# Altium PCB 24V-70A-Power-Board-v2.0.PcbDoc (part 2 of 9)
Units mm, origin at the board's own origin, x right, y up, seen from the top; angles counter-clockwise.
Board outline 350 x 215 mm, 2 copper layers (Top Layer, Bottom Layer), stack 1.64 mm thick; 337 components, 182 nets, 856 pads, 561 vias.
Unrouted connection lines stored in the file: 58.
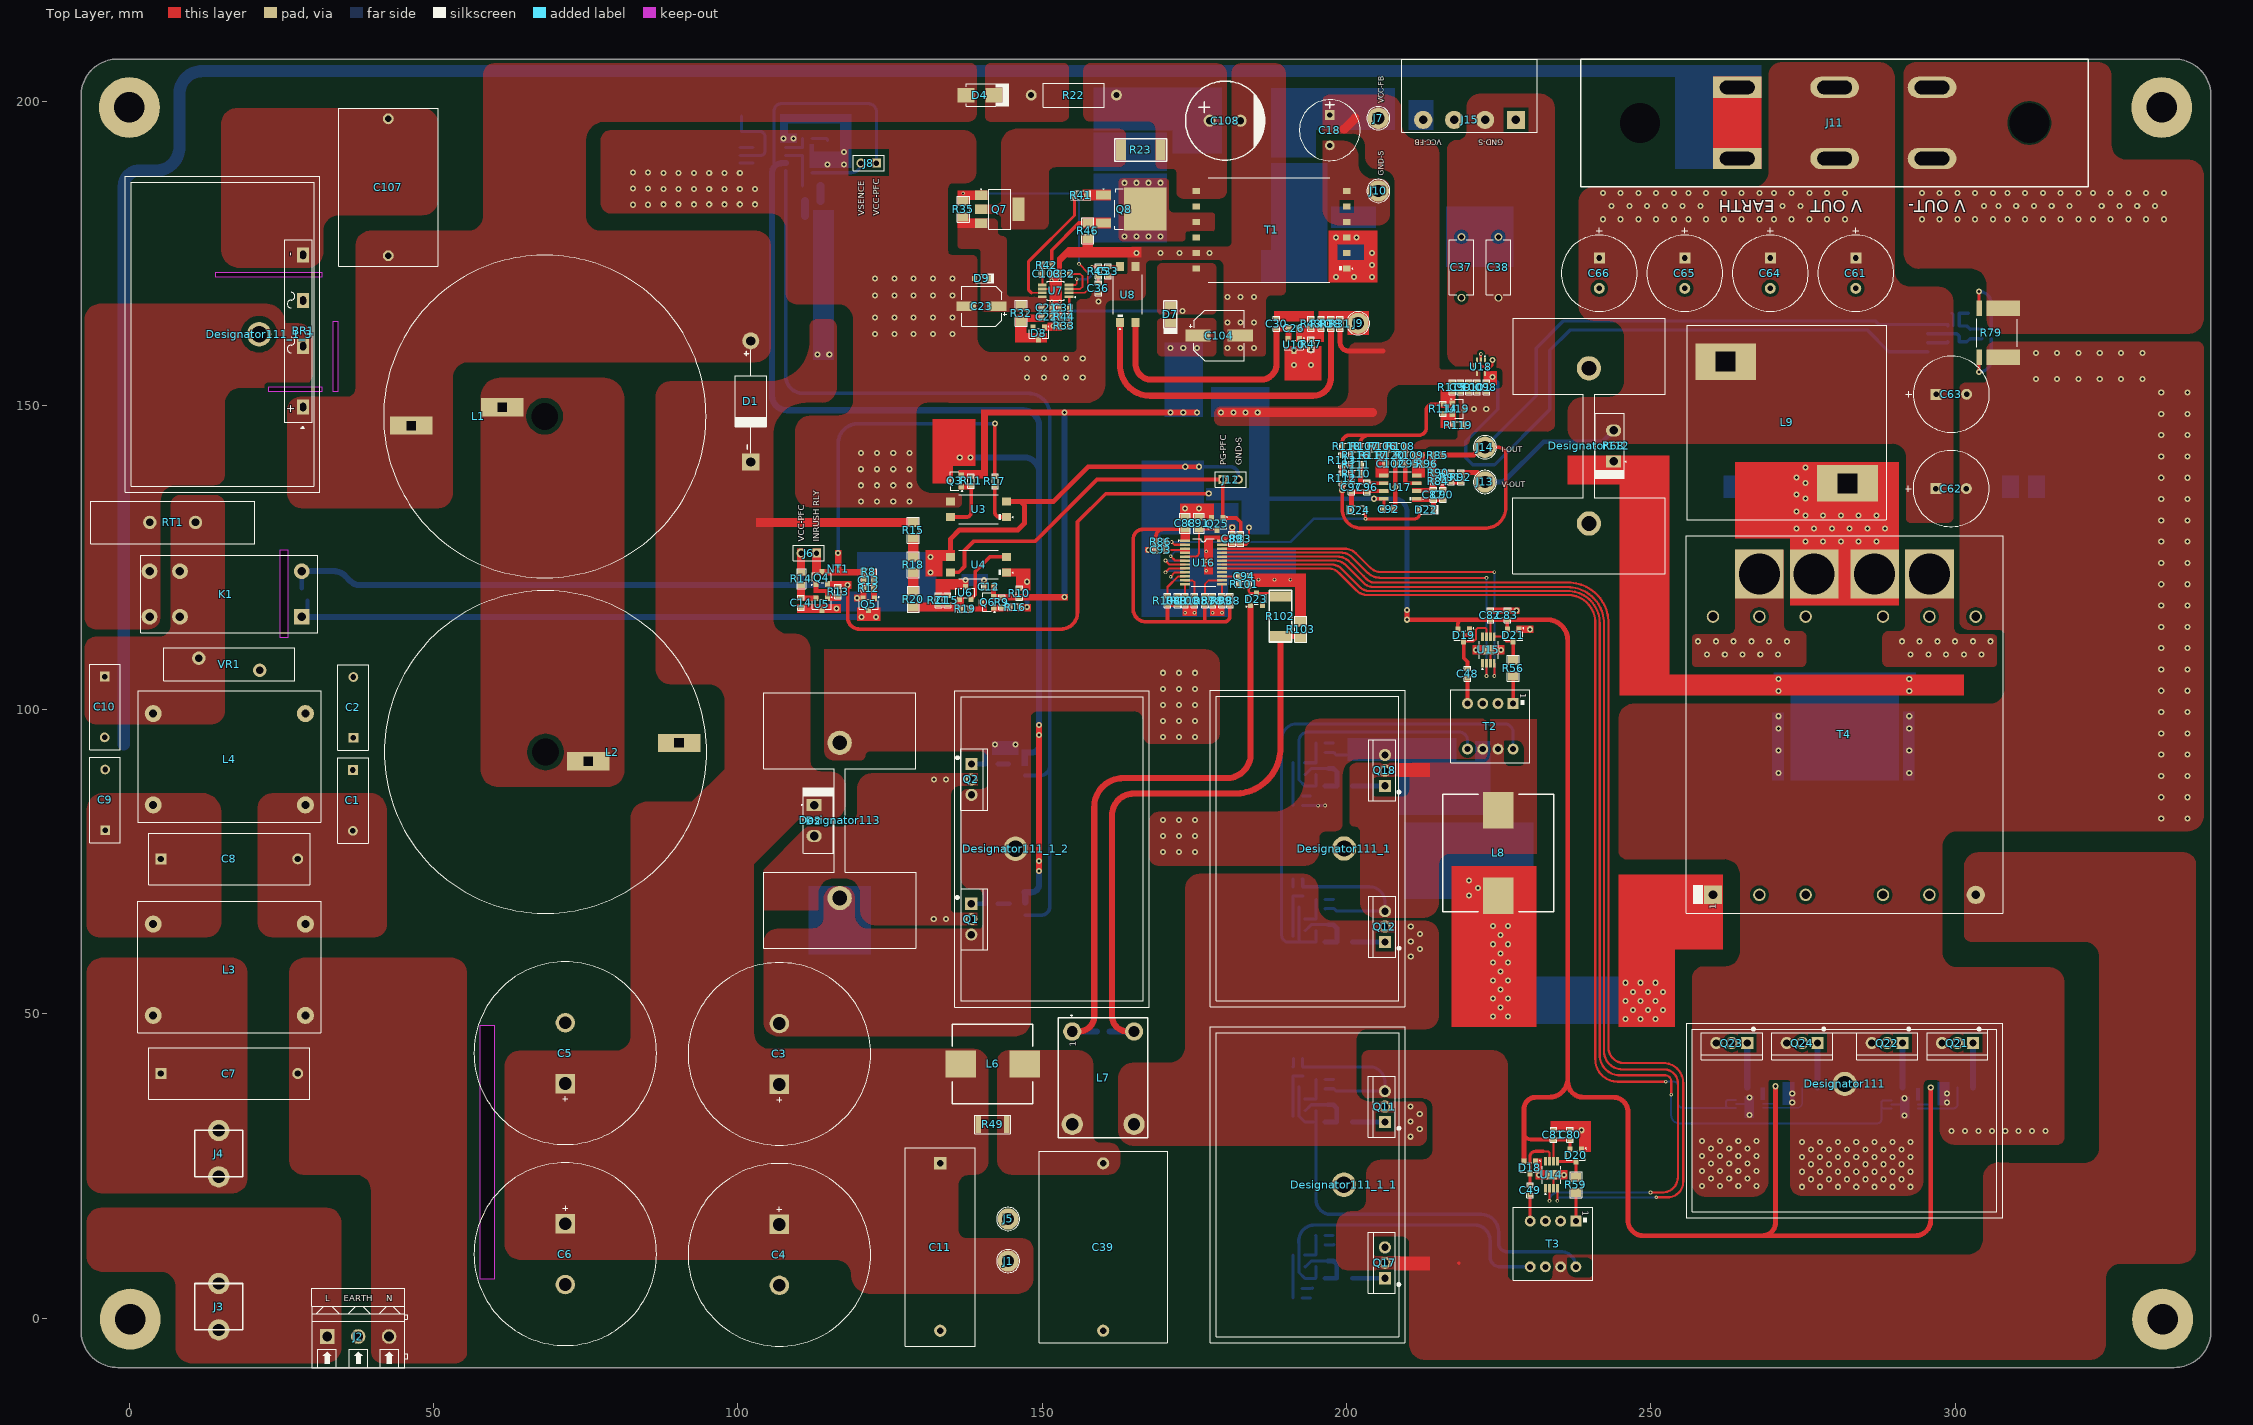
[diagram p0: Top Layer view]

## Part data (continued)
C19 C20: library part C3225X7R1E106MTJ00N, "CAP CER 10UF 25V X7R 1210", LCSC Part Number=C694198, Manufacturer="TDK Corporation", Manufacturer Part Number=C3225X7R1E106M250AC, Package=1210, ComponentLink1Description=LCSC, ComponentLink1URL=https://www.lcsc.com/product-detail/Multilayer-Ceramic-Capacitors-MLCC-SMD-SMT_TDK-C3225X7R1E106MTJ00N_C694198.html, Item Type=Capacitors
C23: library part EEE-FK1H220P, "CAP ALUM 22UF 20% 50V SMD", Case/Package=Radial, Dielectric Material=158ConductorMaterial, ESR (Equivalent Series Resistance)=880mR, LCSC Part Number=C128458, Leakage Current=3uA, Manufacturer=Panasonic, Max Operating Temperature=105°C, Min Operating Temperature=-55°C, Package Quantity=1000, Ratings=AEC-Q200, Ripple Current=165mA, Tolerance=20%, Voltage=50V, ComponentLink1Description=https://datasheet.ciiva.com/11777/0900766b80e4e8b0-11777316.pdf?src-supplier=Rs, ComponentLink1URL=https://datasheet.ciiva.com/11777/0900766b80e4e8b0-11777316.pdf?src-supplier=Rs, ComponentLink2Description=https://datasheet.ciiva.com/43463/58258-43463528.pdf?src-supplier=Farnell, ComponentLink2URL=https://datasheet.ciiva.com/43463/58258-43463528.pdf?src-supplier=Farnell, ComponentLink3Description=https://datasheet.ciiva.com/46388/58258-46388569.pdf?src-supplier=Element14, ComponentLink3URL=https://datasheet.ciiva.com/46388/58258-46388569.pdf?src-supplier=Element14, ComponentLink4Description=https://datasheet.ciiva.com/28691/1676921-28691087.pdf?src-supplier=Element14, ComponentLink4URL=https://datasheet.ciiva.com/28691/1676921-28691087.pdf?src-supplier=Element14, ComponentLink5Description=https://datasheet.ciiva.com/24072/aba0000ce120-24072156.pdf?src-supplier=Mouser, ComponentLink5URL=https://datasheet.ciiva.com/24072/aba0000ce120-24072156.pdf?src-supplier=Mouser, ComponentLink6Description=https://datasheet.ciiva.com/14605/70258115-14605607.pdf?src-supplier=Allied+Electronics, ComponentLink6URL=https://datasheet.ciiva.com/14605/70258115-14605607.pdf?src-supplier=Allied+Electronics, ComponentLink7Description=https://datasheet.ciiva.com/14607/70258115-14607833.pdf?src-supplier=Allied+Electronics, ComponentLink7URL=https://datasheet.ciiva.com/14607/70258115-14607833.pdf?src-supplier=Allied+Electronics, ComponentLink8Description=https://datasheet.ciiva.com/43485/1676921-43485511.pdf?src-supplier=Farnell, ComponentLink8URL=https://datasheet.ciiva.com/43485/1676921-43485511.pdf?src-supplier=Farnell, ComponentLink9Description=https://datasheet.ciiva.com/46388/1676921-46388589.pdf?src-supplier=Element14, ComponentLink9URL=https://datasheet.ciiva.com/46388/1676921-46388589.pdf?src-supplier=Element14, ComponentLink10Description=https://datasheet.ciiva.com/6085/1676921-6085161.pdf?src-supplier=Farnell, ComponentLink10URL=https://datasheet.ciiva.com/6085/1676921-6085161.pdf?src-supplier=Farnell, ComponentLink11Description=https://datasheet.ciiva.com/46376/1676921-46376472.pdf?src-supplier=Element14, ComponentLink11URL=https://datasheet.ciiva.com/46376/1676921-46376472.pdf?src-supplier=Element14, ComponentLink12Description=https://datasheet.ciiva.com/16449/aba0000ce120-16449096.pdf?src-supplier=Future+Electronics, ComponentLink12URL=https://datasheet.ciiva.com/16449/aba0000ce120-16449096.pdf?src-supplier=Future+Electronics, Construction=Cylindrical, Diameter=6.3mm, Dissipation Factor=10%, Height=5.8mm, Impedance=880mR, Item Type=Capacitors, Lead Free="Lead Free", Length=5.8mm, Life (Hours)=2000Hour, Manufacturer Part Number=EEE-FK1H220P, Mounting Technology="Surface Mount,PCB", Packaging="Tape and Reel", Pins=2, Pricing="1=0.42, 10=0.227, 50=0.227, 100=0.147, 1000=0.117, 10000=0.098 (USD)", Radiation Hardening=No, Reach SVHC Compliant=No, Ripple Current (AC)=165mA, RoHS=Yes, RoHS Compliant=Yes, Series=FK, Stock=69938, Supplier=Mouser, Termination=SMD/SMT, Voltage Rating=50V, Voltage Rating (DC)=50V, Width=7.8mm
C25 C26 C96: library part 06035A561JAT2A, "CAP CER 560PF 50V C0G/NP0 0603", LCSC Part Number=C597173, Manufacturer="Kyocera AVX", ComponentLink1Description=https://datasheet.ciiva.com/27051/1032160-27051276.pdf?src-supplier=Jameco, ComponentLink1URL=https://datasheet.ciiva.com/27051/1032160-27051276.pdf?src-supplier=Jameco, ComponentLink2Description=https://datasheet.ciiva.com/16286/ccog-16286446.pdf?src-supplier=Future+Electronics, ComponentLink2URL=https://datasheet.ciiva.com/16286/ccog-16286446.pdf?src-supplier=Future+Electronics, ComponentLink3Description=https://datasheet.ciiva.com/150/ccog-150647.pdf?src-supplier=Digikey, ComponentLink3URL=https://datasheet.ciiva.com/150/ccog-150647.pdf?src-supplier=Digikey, ComponentLink4Description=https://datasheet.ciiva.com/150/ccog-150648.pdf?src-supplier=Digikey, ComponentLink4URL=https://datasheet.ciiva.com/150/ccog-150648.pdf?src-supplier=Digikey, ComponentLink5Description=https://datasheet.ciiva.com/150/ccog-150649.pdf?src-supplier=Digikey, ComponentLink5URL=https://datasheet.ciiva.com/150/ccog-150649.pdf?src-supplier=Digikey, ComponentLink6Description=https://datasheet.ciiva.com/2987/ccog-2987809.pdf?src-supplier=Avnet, ComponentLink6URL=https://datasheet.ciiva.com/2987/ccog-2987809.pdf?src-supplier=Avnet, ComponentLink7Description=https://datasheet.ciiva.com/2987/ccog-2987810.pdf?src-supplier=Avnet, ComponentLink7URL=https://datasheet.ciiva.com/2987/ccog-2987810.pdf?src-supplier=Avnet, ComponentLink8Description=https://datasheet.ciiva.com/5423/ccog-5423589.pdf?src-supplier=Mouser, ComponentLink8URL=https://datasheet.ciiva.com/5423/ccog-5423589.pdf?src-supplier=Mouser, ComponentLink9Description=https://datasheet.ciiva.com/14598/70001039-14598549.pdf?src-supplier=Allied+Electronics, ComponentLink9URL=https://datasheet.ciiva.com/14598/70001039-14598549.pdf?src-supplier=Allied+Electronics, ComponentLink10Description=https://datasheet.ciiva.com/1124/425357-1124836.pdf?src-supplier=Element14, ComponentLink10URL=https://datasheet.ciiva.com/1124/425357-1124836.pdf?src-supplier=Element14, ComponentLink11Description=https://datasheet.ciiva.com/1124/425357-1124837.pdf?src-supplier=Element14, ComponentLink11URL=https://datasheet.ciiva.com/1124/425357-1124837.pdf?src-supplier=Element14, Item Type=Capacitor, Manufacturer Part Number=06035A561JAT2A, Pricing="4000=0.0172, 16000=0.0165, 40000=0.0091, 60000=0.0158, 100000=0.0088, 120000=0.0155, 160000=0.0083, 300000=0.0148 (USD)", RoHS=Yes, Stock=180000, Supplier="Future Electronics"
C27: library part CC0603JRNPO9BN821, "CAP CER 820PF 50V C0G/NPO 0603", Case Code (Imperial)=0603, Case Code (Metric)=1608, Dielectric=C0G, LCSC Part Number=C107057, Manufacturer=Yageo, Max Operating Temperature=125°C, Min Operating Temperature=-55°C, Tolerance=5%, Voltage Rating=50V, Case/Package=0603, ComponentLink1Description=https://datasheet.ciiva.com/26829/getdatasheetpartid-403541-26829388.pdf?src-supplier=Verical, ComponentLink1URL=https://datasheet.ciiva.com/26829/getdatasheetpartid-403541-26829388.pdf?src-supplier=Verical, Depth=0.8mm, Height=0.8mm, Item Type=Capacitors, Lead Free="Lead Free", Length=1.6mm, Manufacturer Part Number=CC0603JRNPO9BN821, Mounting Technology="Surface Mount", Packaging="Tape and Reel", Pins=2, Pricing="4000=0.0129, 24000=0.0087, 48000=0.0086 (USD)", Radiation Hardening=No, RoHS=Yes, RoHS Compliant=Yes, Series=CC, Stock=772000, Supplier="Arrow Electronics", Termination=SMD/SMT, Thickness=0.035inch, Voltage Rating (DC)=50V, Width=0.031inch
C28: library part CL10A474KB8NNNC, "CAP CER 0.47UF 50V X5R 0603", Capacitance=470nF, Case Code (Imperial)=0603, Case Code (Metric)=1608, Dielectric=X5R, LCSC Part Number=C170149, Manufacturer=Samsung, Max Operating Temperature=85°C, Min Operating Temperature=-55°C, Package Quantity=1, Tolerance=10%, Voltage Rating=50V, Case/Package=0603, Category="Ceramic Capacitors", ComponentLink1Description=https://datasheet.ciiva.com/25798/cl10a474kb8nnnc-25798516.pdf?src-supplier=Digi-Key, ComponentLink1URL=https://datasheet.ciiva.com/25798/cl10a474kb8nnnc-25798516.pdf?src-supplier=Digi-Key, ComponentLink2Description=https://datasheet.ciiva.com/15195/getdatasheetpartid-353290-15195713.pdf?src-supplier=Verical, ComponentLink2URL=https://datasheet.ciiva.com/15195/getdatasheetpartid-353290-15195713.pdf?src-supplier=Verical, Construction=Flat, Depth=0.8mm, Height=0.8mm, Lead Free="Lead Free", Length=1.6mm, Manufacturer Part Number=CL10A474KB8NNNC, Mount="Surface Mount", Packaging="Tape and Reel", Pricing 1="200000=0.04290, 300000=0.04250, 400000=0.04210, 500000=0.04170, 1000000=0.04120, 2000000=0.04080 (USD)", Radiation Hardening=No, RoHS=Yes, RoHS Compliant=Yes, Series=CL, Stock 1=196000, Supplier 1="Arrow Electronics", Supplier Part Number 1=CL10A474KB8NNNC, Thickness=0.035inch, Voltage Rating (DC)=50V, Width=0.031inch
C29: library part C1210C335K5RAC7800, "CAP CER 3.3UF 50V X7R 1210", Manufacturer=KEMET, Package=1210, Item Type=Capacitor, Manufacturer Part Number=C1210C335K5RAC7800
C31: library part CGA3E2C0G2A680JT0Y0N, "CAP CER 68PF 100V C0G 0603", LCSC Part Number=C694224, Manufacturer=TDK, Package=0603, Item Type=Capacitor, Manufacturer Part Number=CGA3E2C0G2A680JT0Y0N
C32 C95 C102: library part CC0603KRX7R7BB224, "CAP CER 0.22UF 16V X7R 0603", Manufacturer=Yageo, Supplier Part Number=311-1426-1-ND, Voltage Rating (DC)=16V, ComponentLink1Description=https://datasheet.ciiva.com/11788/0900766b80d84f1d-11788400.pdf?src-supplier=Rs, ComponentLink1URL=https://datasheet.ciiva.com/11788/0900766b80d84f1d-11788400.pdf?src-supplier=Rs, ComponentLink2Description=https://datasheet.ciiva.com/176/mlccorderingcode-176606.pdf?src-supplier=Digikey, ComponentLink2URL=https://datasheet.ciiva.com/176/mlccorderingcode-176606.pdf?src-supplier=Digikey, ComponentLink3Description=https://datasheet.ciiva.com/176/mlccorderingcode-176607.pdf?src-supplier=Digikey, ComponentLink3URL=https://datasheet.ciiva.com/176/mlccorderingcode-176607.pdf?src-supplier=Digikey, ComponentLink4Description=https://datasheet.ciiva.com/176/mlccorderingcode-176608.pdf?src-supplier=Digikey, ComponentLink4URL=https://datasheet.ciiva.com/176/mlccorderingcode-176608.pdf?src-supplier=Digikey, Halogen Free=5694HalogenFree, Item Type=Capacitor, Lead Free=5697LeadFree, Manufacturer Part Number=CC0603KRX7R7BB224, Material=4241ConductorMaterial, Pricing="1=0.1, 10=0.058, 50=0.0334, 100=0.0258, 500=0.01944, 1000=0.01528 (USD)", RoHS=Yes, Stock=45192, Supplier=Digikey
C33 C93 C103: library part C1608C0G1H221JT000N, "CAP CER 220PF 50V C0G 0603", LCSC Part Number=C695131, Manufacturer="TDK Corporation", Manufacturer Part Number=C1608C0G1H221J080AA, Package=0603, ComponentLink1Description=LCSC, ComponentLink1URL=https://www.lcsc.com/product-detail/Multilayer-Ceramic-Capacitors-MLCC-SMD-SMT_TDK-C1608C0G1H221JT000N_C695131.html, Item Type=Capacitors
C36 C42 C43 C44 C45 C52 C53 C54 C55 C79 C86 C97: library part CGA3E2X7R2A223K080AA, "CAP CER 0.022UF 100V X7R 0603", Case Code (Imperial)=0603, Case Code (Metric)=1608, Dielectric=X7R, LCSC Part Number=C2167165, Manufacturer=TDK, Max Operating Temperature=125°C, Min Operating Temperature=-55°C, Package Quantity=1, Ratings=AEC-Q200, Resistor Type=Ceramic, Supplier Part Number 1=445-5814-1-ND, Tolerance=10%, Voltage Rating=100V, Capacitance=22nF, Case/Package=0603, Category="Ceramic Capacitors", ComponentLink1Description=https://datasheet.ciiva.com/22725/1735406-22725648.pdf?src-supplier=Element14, ComponentLink1URL=https://datasheet.ciiva.com/22725/1735406-22725648.pdf?src-supplier=Element14, ComponentLink2Description=https://datasheet.ciiva.com/24218/cga3e2x7r2a223k080aa-266292-24218959.pdf?src-supplier=Mouser, ComponentLink2URL=https://datasheet.ciiva.com/24218/cga3e2x7r2a223k080aa-266292-24218959.pdf?src-supplier=Mouser, ComponentLink3Description=https://datasheet.ciiva.com/7975/1807242-7975349.pdf?src-supplier=Element14, ComponentLink3URL=https://datasheet.ciiva.com/7975/1807242-7975349.pdf?src-supplier=Element14, Depth=0.8mm, Height=0.8mm, Item Type=Capacitor, Length=1.6mm, Manufacturer Part Number=CGA3E2X7R2A223K080AA, Mount="Surface Mount", Packaging="Tape and Reel", Pricing 1="1=0.11000, 10=0.07600, 50=0.04340, 100=0.03590, 500=0.02516, 1000=0.02083 (USD)", REACH SVHC="No SVHC", RoHS=Yes, RoHS Compliant=Yes, Series=CGA, Stock 1=56079, Supplier 1=Digi-Key, Termination=SMD/SMT, Thickness=0.035inch, Voltage Rating (DC)=100V, Weight=7.1E-05oz, Width=0.031inch
C37 C38: library part DE1E3RA222MN4AP01F, "CAP CER 2200PF 1.5KV RADIAL", LCSC Part Number=C1622500, Manufacturer=Murata, ComponentLink1Description=https://search.murata.co.jp/Ceramy/image/img/A01X/G101/ENG/DE1_RA_P01F_E.pdf?src-supplier=Digikey, ComponentLink1URL=https://search.murata.co.jp/Ceramy/image/img/A01X/G101/ENG/DE1_RA_P01F_E.pdf?src-supplier=Digikey, ComponentLink2Description=http://search.murata.co.jp/Ceramy/image/img/A01X/G101/ENG/DE1_RA_P01F_E.pdf?src-supplier=Digikey, ComponentLink2URL=http://search.murata.co.jp/Ceramy/image/img/A01X/G101/ENG/DE1_RA_P01F_E.pdf?src-supplier=Digikey, Item Type=Capacitors, Manufacturer Part Number=DE1E3RA222MN4AP01F, Pricing="600=0.0835, 2400=0.0795, 9000=0.0758, 18000=0.074, 45000=0.0699 (USD)", RoHS=Yes, Stock=1200, Supplier="Future Electronics"
C39: library part B32774X5106K000, "FILM CAP MKP DC FILTERING - 600V", Manufacturer=TDK, Supplier Part Number=495-B32774X5106K000-ND, Item Type=Capacitor, Manufacturer Part Number=B32774X5106K000, Pricing="1=4.3, 10=2.896, 50=2.3266, 224=1.97978, 672=1.80198, 1120=1.77575 (USD)", RoHS=No, Supplier=Digikey
C58 C59 C60: library part GRM32ER71H106KA12L, "CAP CER 10UF 50V X7R 1210", LCSC Part Number=C77102, Manufacturer=Murata, ComponentLink1Description=https://datasheet.ciiva.com/16497/product-16497010.pdf?src-supplier=Future+Electronics, ComponentLink1URL=https://datasheet.ciiva.com/16497/product-16497010.pdf?src-supplier=Future+Electronics, ComponentLink2Description=https://datasheet.ciiva.com/3777/4286grm32er71h106ka1223-3777306.pdf?src-supplier=Arrow+Electronics, ComponentLink2URL=https://datasheet.ciiva.com/3777/4286grm32er71h106ka1223-3777306.pdf?src-supplier=Arrow+Electronics, ComponentLink3Description=https://datasheet.ciiva.com/11789/0900766b80ef921d-11789081.pdf?src-supplier=Rs, ComponentLink3URL=https://datasheet.ciiva.com/11789/0900766b80ef921d-11789081.pdf?src-supplier=Rs, ComponentLink4Description=https://datasheet.ciiva.com/11607/c02e-11607596.pdf?src-supplier=Avnet, ComponentLink4URL=https://datasheet.ciiva.com/11607/c02e-11607596.pdf?src-supplier=Avnet, ComponentLink5Description=https://datasheet.ciiva.com/6270/partnumbering-e-01-6270167.pdf?src-supplier=Digikey, ComponentLink5URL=https://datasheet.ciiva.com/6270/partnumbering-e-01-6270167.pdf?src-supplier=Digikey, ComponentLink6Description=https://datasheet.ciiva.com/6270/partnumbering-e-01-6270168.pdf?src-supplier=Digikey, ComponentLink6URL=https://datasheet.ciiva.com/6270/partnumbering-e-01-6270168.pdf?src-supplier=Digikey, ComponentLink7Description=https://datasheet.ciiva.com/6270/partnumbering-e-01-6270169.pdf?src-supplier=Digikey, ComponentLink7URL=https://datasheet.ciiva.com/6270/partnumbering-e-01-6270169.pdf?src-supplier=Digikey, ComponentLink8Description=https://datasheet.ciiva.com/46441/1754714-46441340.pdf?src-supplier=Element14, ComponentLink8URL=https://datasheet.ciiva.com/46441/1754714-46441340.pdf?src-supplier=Element14, Item Type=Capacitors, Lead Free=5697LeadFree, Manufacturer Part Number=GRM32ER71H106KA12L, Pricing="1000=0.325, 2000=0.32, 3000=0.315, 4000=0.315, 5000=0.305 (USD)", RoHS=Yes, RoHS Compliant=5897YesNo, Stock=960000, Supplier="Future Electronics"
C61 C62 C63 C64 C65 C66: library part EKZM500ELL471MK20S, "CAP ALUM 50V POLAR", Case/Package=Aluminum, Manufacturer="United Chemi-Con", Max Operating Temperature=105°C, Min Operating Temperature=-40°C, Supplier Part Number=565-EKZM500ELL471MK20S-ND, Tolerance=20%, Voltage Rating=50V, Category="Aluminum Electrolytic Capacitors", ComponentLink1Description=http://www.mouser.com/ds/2/420/15133587752d6c58fb020c-1090524.pdf?src-supplier=Mouser, ComponentLink1URL=http://www.mouser.com/ds/2/420/15133587752d6c58fb020c-1090524.pdf?src-supplier=Mouser, Dissipation Factor=0.1%, Length=20mm, Manufacturer Part Number=EKZM500ELL471MK20S, Packaging=Bulk, Pricing="1=1.02, 10=0.631, 50=0.4744, 100=0.4255, 500=0.34218, 1000=0.31616, 3000=0.28378, 5000=0.27172 (USD)", RoHS=Yes, RoHS Compliant=Yes, Series=KZM, Stock=1959, Supplier=Digikey, Termination=Radial
C71 C72 C77 C78: library part CC1206KKX7RBBB471, "CAP CER 470PF 500V X7R 1206", LCSC Part Number=C513662, Manufacturer=Yageo, ComponentLink1Description=https://datasheet.ciiva.com/26918/getdatasheetpartid-411464-26918346.pdf?src-supplier=Verical, ComponentLink1URL=https://datasheet.ciiva.com/26918/getdatasheetpartid-411464-26918346.pdf?src-supplier=Verical, ComponentLink2Description=https://datasheet.ciiva.com/16743/upy-np0x7r-mv-100-to-630v-9-16743389.pdf?src-supplier=Future+Electronics, ComponentLink2URL=https://datasheet.ciiva.com/16743/upy-np0x7r-mv-100-to-630v-9-16743389.pdf?src-supplier=Future+Electronics, ComponentLink3Description=https://datasheet.ciiva.com/29534/mlccorderingcode-29534108.pdf?src-supplier=Digikey, ComponentLink3URL=https://datasheet.ciiva.com/29534/mlccorderingcode-29534108.pdf?src-supplier=Digikey, ComponentLink4Description=https://datasheet.ciiva.com/13209/upy-gp-np0-16v-to-50v-8-13209817.pdf?src-supplier=Mouser, ComponentLink4URL=https://datasheet.ciiva.com/13209/upy-gp-np0-16v-to-50v-8-13209817.pdf?src-supplier=Mouser, ComponentLink5Description=https://datasheet.ciiva.com/11466/upy-np0x7r-mv-100-to-630v-9-11466693.pdf?src-supplier=Avnet, ComponentLink5URL=https://datasheet.ciiva.com/11466/upy-np0x7r-mv-100-to-630v-9-11466693.pdf?src-supplier=Avnet, Item Type=Capacitors, Lead Free=5697LeadFree, Manufacturer Part Number=CC1206KKX7RBBB471, Pricing="3000=0.0149, 12000=0.0145, 30000=0.0142, 75000=0.014, 120000=0.0136 (USD)", RoHS=Yes, Stock=75000, Supplier="Future Electronics"
C73 C74 C75 C76: library part C3216X7R2E104KT0L0U, "250V 100nF X7R ±10% 1206 Multilayer Ceramic Capacitors MLCC - SMD/SMT ROHS", LCSC Part Number=C76671, Manufacturer=TDK, Package=1206, ComponentLink1Description=LCSC, ComponentLink1URL=https://www.lcsc.com/product-detail/Multilayer-Ceramic-Capacitors-MLCC-SMD-SMT_TDK-C3216X7R2E104KT0L0U_C76671.html, Item Type=Capacitor, Manufacturer Part Number=C3216X7R2E104KT0L0U
C84: library part CL10C102JB8NNNC, "CAP CER 1000PF 50V C0G/NP0 0603", Capacitance=1nF, Case Code (Imperial)=0603, Case Code (Metric)=1608, Dielectric=C0G, LCSC Part Number=C163508, Manufacturer=Samsung, Max Operating Temperature=125°C, Min Operating Temperature=-55°C, Package Quantity=1, Supplier Part Number 1=7665279, Temperature Coefficient=300ppm/°C, Tolerance=5%, Voltage=50V, Case/Package=0603, Category="Ceramic Capacitors", ComponentLink1Description=https://datasheet.ciiva.com/15195/getdatasheetpartid-354056-15195790.pdf?src-supplier=Verical, ComponentLink1URL=https://datasheet.ciiva.com/15195/getdatasheetpartid-354056-15195790.pdf?src-supplier=Verical, ComponentLink2Description=https://datasheet.ciiva.com/29198/458273-da-01-en-vs-kondensator-0603-29198494.pdf?src-supplier=Conrad, ComponentLink2URL=https://datasheet.ciiva.com/29198/458273-da-01-en-vs-kondensator-0603-29198494.pdf?src-supplier=Conrad, ComponentLink3Description=https://datasheet.ciiva.com/26310/mlcc-catalogdownload2013-eng-26310329.pdf?src-supplier=Distrelec, ComponentLink3URL=https://datasheet.ciiva.com/26310/mlcc-catalogdownload2013-eng-26310329.pdf?src-supplier=Distrelec, Depth=0.8mm, Height=0.8mm, Item Type=Capacitor, Lead Free="Lead Free", Length=1.6mm, Manufacturer Part Number=CL10C102JB8NNNC, Material=Ceramic, Mount="Surface Mount", Packaging="Tape and Reel", Pricing 1="4000=0.00600, 12000=0.00600, 20000=0.00600, 40000=0.00500, 100000=0.00500 (GBP)", Radiation Hardening=No, RoHS=Yes, RoHS Compliant=Yes, Series=CL, Stock 1=616000, Supplier 1=RSComponents, Thickness=0.035inch, Voltage Rating=50V, Voltage Rating (DC)=50V, Width=0.031inch
C87: library part C1608C0G1H222JT000N, "CAP CER 2200PF 50V C0G 0603", LCSC Part Number=C76601, Manufacturer="TDK Corporation", Manufacturer Part Number=C1608C0G1H222J080AA, Package=0603, ComponentLink1Description=LCSC, ComponentLink1URL=https://www.lcsc.com/product-detail/Multilayer-Ceramic-Capacitors-MLCC-SMD-SMT_TDK-C1608C0G1H222JT000N_C76601.html, Item Type=Capacitor
C88: library part EMK212B7225KGHT, "CAP CER 2.2UF 16V X7R 0805", LCSC Part Number=C385899, Manufacturer="Taiyo Yuden", ComponentLink1Description=http://www.mouser.com/ds/2/396/mlcc11_hq_e-541564.pdf?src-supplier=Mouser, ComponentLink1URL=http://www.mouser.com/ds/2/396/mlcc11_hq_e-541564.pdf?src-supplier=Mouser, ComponentLink2Description=https://datasheet.octopart.com/EMK212B7225KGHT-Taiyo-Yuden-datasheet-152732874.pdf?src-supplier=Newark, ComponentLink2URL=https://datasheet.octopart.com/EMK212B7225KGHT-Taiyo-Yuden-datasheet-152732874.pdf?src-supplier=Newark, ComponentLink3Description=https://datasheet.octopart.com/EMK212B7225KGHT-Taiyo-Yuden-datasheet-97186030.pdf?src-supplier=Future+Electronics, ComponentLink3URL=https://datasheet.octopart.com/EMK212B7225KGHT-Taiyo-Yuden-datasheet-97186030.pdf?src-supplier=Future+Electronics, ComponentLink4Description="https://ds.yuden.co.jp/TYCOMPAS/ut/detail?pn=EMK212B7225KGHT  &amp;u=M&src-supplier=Digikey", ComponentLink4URL="https://ds.yuden.co.jp/TYCOMPAS/ut/detail?pn=EMK212B7225KGHT  &amp;u=M&src-supplier=Digikey", ComponentLink5Description=http://www.yuden.co.jp/productdata/catalog/en/mlcc01_hq_e.pdf?src-supplier=Digikey, ComponentLink5URL=http://www.yuden.co.jp/productdata/catalog/en/mlcc01_hq_e.pdf?src-supplier=Digikey, ComponentLink6Description=http://www.yuden.co.jp/ut/product/category/capacitor/putpdf/EMK212B7225KGHT.pdf?src-supplier=Avnet, ComponentLink6URL=http://www.yuden.co.jp/ut/product/category/capacitor/putpdf/EMK212B7225KGHT.pdf?src-supplier=Avnet, ComponentLink7Description=https://datasheet.octopart.com/EMK212B7225KGHT-Taiyo-Yuden-datasheet-154808297.pdf?src-supplier=Master+Electronics, ComponentLink7URL=https://datasheet.octopart.com/EMK212B7225KGHT-Taiyo-Yuden-datasheet-154808297.pdf?src-supplier=Master+Electronics, Halogen Free=5694HalogenFree, Item Type=Capacitors, Lead Free=5697LeadFree, Manufacturer Part Number=EMK212B7225KGHT, Material=4241ConductorMaterial, Pricing="1=0.24, 10=0.137, 50=0.097, 100=0.0847, 500=0.06374, 1000=0.05721 (USD)", RoHS=Yes, Stock=8236, Supplier=Digikey
C91: library part VJ0805Y474KXJTW1BC, "CAP CER 0.47UF 16V X7R 0805", LCSC Part Number=C2174635, Manufacturer="Vishay Vitramon", ComponentLink1Description=https://datasheet.ciiva.com/5416/vjw1bcbascomseries-223529-5416469.pdf?src-supplier=Mouser, ComponentLink1URL=https://datasheet.ciiva.com/5416/vjw1bcbascomseries-223529-5416469.pdf?src-supplier=Mouser, Item Type=Capacitors, Manufacturer Part Number=VJ0805Y474KXJTW1BC, Pricing="1=0.2, 10=0.092, 50=0.092, 100=0.053, 1000=0.048, 10000=0.037 (USD)", RoHS=Yes, Stock=5925, Supplier=Mouser
C94 C101: library part CC0603JRNPO9BN331, "CAP CER 330PF 50V C0G/NPO 0603", Capacitor Type=Ceramic, Case/Package=0603, LCSC Part Number=C62784, Manufacturer=Yageo, Max Operating Temperature=125°C, Min Operating Temperature=-55°C, Package Shape=Rectangular, Package Style=SMTMeter, Rated DC Voltage (URdc)=50V, Supplier Part Number 1=8843708, Temperature Characteristics Code=C0G, Tolerance  (fill in as +-)=5%, Category="Ceramic Capacitors", ComponentLink1Description=https://datasheet.ciiva.com:443/pdfs/VipMasterIC/IC/YAGO/YAGO-S-A0009251638/YAGO-S-A0009251638-1.pdf?src-supplier=IHS+Markit, ComponentLink1URL=https://datasheet.ciiva.com:443/pdfs/VipMasterIC/IC/YAGO/YAGO-S-A0009251638/YAGO-S-A0009251638-1.pdf?src-supplier=IHS+Markit, ComponentLink2Description=https://datasheet.ciiva.com/28450/1443161-28450501.pdf?src-supplier=Element14, ComponentLink2URL=https://datasheet.ciiva.com/28450/1443161-28450501.pdf?src-supplier=Element14, ComponentLink3Description=https://datasheet.ciiva.com/144/mlccorderingcode-144957.pdf?src-supplier=Digi-Key, ComponentLink3URL=https://datasheet.ciiva.com/144/mlccorderingcode-144957.pdf?src-supplier=Digi-Key, ComponentLink4Description=https://datasheet.ciiva.com/144/mlccorderingcode-144956.pdf?src-supplier=Digi-Key, ComponentLink4URL=https://datasheet.ciiva.com/144/mlccorderingcode-144956.pdf?src-supplier=Digi-Key, ComponentLink5Description=https://datasheet.ciiva.com/144/mlccorderingcode-144958.pdf?src-supplier=Digi-Key, ComponentLink5URL=https://datasheet.ciiva.com/144/mlccorderingcode-144958.pdf?src-supplier=Digi-Key, ComponentLink6Description=https://datasheet.ciiva.com/8033/1443161-8033739.pdf?src-supplier=Element14, ComponentLink6URL=https://datasheet.ciiva.com/8033/1443161-8033739.pdf?src-supplier=Element14, ComponentLink7Description=https://datasheet.ciiva.com/8033/1443161-8033737.pdf?src-supplier=Element14, ComponentLink7URL=https://datasheet.ciiva.com/8033/1443161-8033737.pdf?src-supplier=Element14, ComponentLink8Description=https://datasheet.ciiva.com/13389/upy-gp-np0-16v-to-50v-8-13389983.pdf?src-supplier=Mouser, ComponentLink8URL=https://datasheet.ciiva.com/13389/upy-gp-np0-16v-to-50v-8-13389983.pdf?src-supplier=Mouser, ComponentLink9Description=https://datasheet.ciiva.com/11587/upy-gp-np0-16v-to-50v-8-11587326.pdf?src-supplier=Avnet, ComponentLink9URL=https://datasheet.ciiva.com/11587/upy-gp-np0-16v-to-50v-8-11587326.pdf?src-supplier=Avnet, ComponentLink10Description=https://datasheet.ciiva.com/26829/getdatasheetpartid-403533-26829382.pdf?src-supplier=Verical, ComponentLink10URL=https://datasheet.ciiva.com/26829/getdatasheetpartid-403533-26829382.pdf?src-supplier=Verical, Dielectric Material=Ceramic, Height=0.8mm, Item Type=Capacitor, JESD-609 Code=e3, Length=1.6mm, Manufacturer Part Number=CC0603JRNPO9BN331, Mounting Technology="Surface Mount", Multilayer=Yes, Packaging="Tape and Reel", Pins=2, Pricing 1="4000=0.00990, 16000=0.00940, 20000=0.00980, 40000=0.00910, 80000=0.00930, 100000=0.00880, 160000=0.00830, 200000=0.00900, 500000=0.00850 (USD)", Reach SVHC Compliant=Yes, RoHS=Yes, RoHS Compliant=Yes, Stock 1=40000, Supplier 1="Future Electronics", Terminal Finish=Nickel, Termination=Wraparound, Tolerance (fill in as +-)=5%, Width=0.8mm
C104: library part 25SVPF100M, "CAP ALUM POLY 100UF 20% 25V SMD", Case/Package=Radial, ESR (Equivalent Series Resistance)=24mR, LCSC Part Number=C136279, Leakage Current=500uA, Manufacturer=Panasonic, Max Operating Temperature=105°C, Min Operating Temperature=-55°C, Package Quantity=1000, Ripple Current=3.2A, Supplier Part Number 1=P123675CT-ND, Tolerance=20%, Voltage=25V, Capacitance=100uF, Category="Aluminum Electrolytic Capacitors", ComponentLink1Description=https://datasheet.ciiva.com/25746/1734360-25746518.pdf?src-supplier=Farnell, ComponentLink1URL=https://datasheet.ciiva.com/25746/1734360-25746518.pdf?src-supplier=Farnell, ComponentLink2Description=https://datasheet.ciiva.com/22746/1734360-22746213.pdf?src-supplier=Element14, ComponentLink2URL=https://datasheet.ciiva.com/22746/1734360-22746213.pdf?src-supplier=Element14, ComponentLink3Description=https://datasheet.ciiva.com/24064/svpf-os-262415-24064540.pdf?src-supplier=Mouser, ComponentLink3URL=https://datasheet.ciiva.com/24064/svpf-os-262415-24064540.pdf?src-supplier=Mouser, Diameter=8mm, Dissipation Factor=12%, Height=6.9mm, Height - Seated (Max)=0.276inch, Item Type=Capacitor, Lead Free="Lead Free", Length=6.9mm, Life (Hours)=5000Hour, Manufacturer Part Number=25SVPF100M, Mount="Surface Mount", Number of Pins=7, Packaging="Tape and Reel", Pricing 1="1=1.68000, 10=1.32800, 50=1.15080, 100=0.99590, 500=0.75246 (USD)", Reach SVHC Compliant=Yes, Ripple Current (AC)=3.2A, RoHS=Yes, RoHS Compliant=Yes, Series="OS-CON, SVPF", Stock 1=5809, Supplier 1=Digi-Key, Termination=SMD/SMT, Voltage Rating=25V, Voltage Rating (DC)=25V
C107: library part ECW-FA2J225J, "CAP FILM 2.2UF 5% 630VDC RADIAL", Case/Package=Radial, Dielectric=PP, Manufacturer=Panasonic, Max Operating Temperature=105°C, Min Operating Temperature=-40°C, Package Quantity=400, Supplier Part Number=667-ECW-FA2J225J, Tolerance=5%, Voltage Rating=630V, ComponentLink1Description=https://datasheet.ciiva.com/15908/abd0000ce47-15908716.pdf?src-supplier=Onlinecomponents.com, ComponentLink1URL=https://datasheet.ciiva.com/15908/abd0000ce47-15908716.pdf?src-supplier=Onlinecomponents.com, ComponentLink2Description=https://datasheet.ciiva.com/30167/44abd0000ce47-30167191.pdf?src-supplier=Onlinecomponents.com, ComponentLink2URL=https://datasheet.ciiva.com/30167/44abd0000ce47-30167191.pdf?src-supplier=Onlinecomponents.com, ComponentLink3Description=https://datasheet.ciiva.com/6282/abd0000ce47-6282218.pdf?src-supplier=Digikey, ComponentLink3URL=https://datasheet.ciiva.com/6282/abd0000ce47-6282218.pdf?src-supplier=Digikey, Dielectric Material=PP, Height=21.4mm, Item Type=Capacitors, Lead Pitch=22.5mm, Length=26mm, Manufacturer Part Number=ECW-FA2J225J, Mounting Technology="Through Hole", Packaging=Bulk, Pricing="1=1.91, 10=1.33, 50=1.07, 100=0.965, 1000=0.75, 10000=0.75 (USD)", Reach SVHC Compliant=Unknown, RoHS=Yes, Series=ECW-F(A), Stock=55, Supplier=Mouser, Termination="PC Pins", Voltage Rating (DC)=630V, Width=16.3mm
C108: library part 01EC2051, "22uF 450V 1.9Ω@100kHz ±20% 560mA@100kHz Plugin,D13xL20mm Aluminum Electrolytic Capacitors - Leaded ROHS", LCSC Part Number=C2766207, Manufacturer=KNSCHA, Package=Plugin,D13xL20mm, ComponentLink1Description=LCSC, ComponentLink1URL=https://www.lcsc.com/product-detail/Aluminum-Electrolytic-Capacitors-Leaded_KNSCHA-01EC2051_C2766207.html, Item Type=Capacitor, Manufacturer Part Number=01EC2051
D1: "DIODE GEN PURP 600V 3A DO201AD", Average Rectified Current=3A, Case/Package=DO-201AD, LCSC Part Number=C467496, Manufacturer="Vishay Semiconductors", Max Operating Temperature=150°C, Max Repetitive Reverse Voltage (Vrrm)=600V, Max Reverse Current=5uA, Max Surge Current=200A, Min Operating Temperature=-50°C, Package Quantity=1000, ComponentLink1Description=http://www.mouser.com/ds/2/427/1n5400-240276.pdf?src-supplier=Mouser, ComponentLink1URL=http://www.mouser.com/ds/2/427/1n5400-240276.pdf?src-supplier=Mouser, ComponentLink2Description=http://www.vishay.com/docs/88516/1n5400.pdf?src-supplier=Digikey, ComponentLink2URL=http://www.vishay.com/docs/88516/1n5400.pdf?src-supplier=Digikey, ComponentLink3Description=http://www.vishay.com/docs/88516/1n5400.pdf?src-supplier=Avnet, ComponentLink3URL=http://www.vishay.com/docs/88516/1n5400.pdf?src-supplier=Avnet, Contact Plating=Tin,Matte, Forward Current=3A, Item Type=Diode, Manufacturer Part Number=1N5406-E3/73, Max Reverse Voltage (DC)=600V, Mounting Technology="Through Hole", Packaging="Tape and Reel", Peak Non-Repetitive Surge Current=200A, Pricing="1=0.53, 10=0.453, 50=0.453, 100=0.315, 1000=0.214, 10000=0.16 (USD)", Radiation Hardening=No, Reverse Voltage=600V, RoHS=Yes, Series=-, Stock=23612, Supplier=Mouser
D2: "600V 1.8V@10A 10A TO-220-2 SiC Diodes ROHS", LCSC Part Number=C535874, Manufacturer=Infineon, ComponentLink1Description=https://datasheet.ciiva.com/924/infineon-idh10sg60c-ds-v02-04-en-924234.pdf?src-supplier=Digikey, ComponentLink1URL=https://datasheet.ciiva.com/924/infineon-idh10sg60c-ds-v02-04-en-924234.pdf?src-supplier=Digikey, ComponentLink2Description=https://datasheet.ciiva.com/16386/idh10sg60c-rev2-4-78863-16386579.pdf?src-supplier=Mouser, ComponentLink2URL=https://datasheet.ciiva.com/16386/idh10sg60c-rev2-4-78863-16386579.pdf?src-supplier=Mouser, ComponentLink3Description=https://datasheet.ciiva.com/8300/infineon-idh10sg60c-ds-v02-04-en-8300971.pdf?src-supplier=Avnet, ComponentLink3URL=https://datasheet.ciiva.com/8300/infineon-idh10sg60c-ds-v02-04-en-8300971.pdf?src-supplier=Avnet, Item Type=Diodes, Manufacturer Part Number=IDH10SG60C, Pricing="1=5.14, 10=4.32, 50=4.32, 100=3.49, 1000=2.66, 10000=2.5 (USD)", RoHS=Yes, Stock=239, Supplier=Mouser
D3 D8 D10 D23: "200V Independent Type 1.25V@200mA 50ns 200mA SOT-23 Switching Diodes ROHS", LCSC Part Number=C3313195, Manufacturer=MCC, Package=SOT-23, ComponentLink1Description=LCSC, ComponentLink1URL=https://www.lcsc.com/product-detail/Switching-Diodes_MCC-Micro-Commercial-Components-BAS21HE3-TP_C3313195.html, Item Type=Diode, Manufacturer Part Number=BAS21HE3-TP
D4: "DIODE GEN PURP 1KV 1A SMB", Average Rectified Current=1A, Case/Package=SMB, Forward Voltage=1.3V, LCSC Part Number=C154864, Manufacturer=Diodes, Max Operating Temperature=150°C, Max Repetitive Reverse Voltage (Vrrm)=1kV, Max Reverse Current=5uA, Max Surge Current=30A, Min Operating Temperature=-65°C, Package Quantity=3000, ComponentLink1Description=https://datasheet.ciiva.com/8301/ds15002-8301721.pdf?src-supplier=Avnet, ComponentLink1URL=https://datasheet.ciiva.com/8301/ds15002-8301721.pdf?src-supplier=Avnet, ComponentLink2Description=https://datasheet.ciiva.com/26818/getdatasheetpartid-91887-26818092.pdf?src-supplier=Verical, ComponentLink2URL=https://datasheet.ciiva.com/26818/getdatasheetpartid-91887-26818092.pdf?src-supplier=Verical, ComponentLink3Description=https://datasheet.ciiva.com/8301/ds15002-8301350.pdf?src-supplier=Avnet, ComponentLink3URL=https://datasheet.ciiva.com/8301/ds15002-8301350.pdf?src-supplier=Avnet, Current Rating=1A, Forward Current=1A, Height=2.42mm, Item Type=Diodes, Lead Free="Lead Free", Length=4.57mm, Manufacturer Part Number=RS1MB-13-F, Max Reverse Voltage (DC)=1kV, Mounting Technology="Surface Mount", Output Current=1A, Packaging="Tape and Reel", Peak Non-Repetitive Surge Current=30A, Pins=2, Polarity=Standard, Pricing="3000=0.0825, 6000=0.093, 9000=0.0794, 12000=0.0905, 15000=0.078, 30000=0.0761, 60000=0.0732 (USD)", Radiation Hardening=No, Recovery Time=500ns, Reverse Recovery Time=500ns, Reverse Recovery Time-Max=500ns, Reverse Voltage (DC)=1kV, RoHS=Yes, RoHS Compliant=Yes, Series=-, Stock=45000, Supplier="Future Electronics", Voltage Rating (DC)=1kV, Weight=0.00328oz, Width=3.94mm
D5: "DIODE SCHOTTKY 100V 2A SMB", LCSC Part Number=C83299, Manufacturer="ON Semiconductor", ComponentLink1Description=https://datasheet.ciiva.com/916/mbrs2h100-d-916033.pdf?src-supplier=Digikey, ComponentLink1URL=https://datasheet.ciiva.com/916/mbrs2h100-d-916033.pdf?src-supplier=Digikey, ComponentLink2Description=https://datasheet.ciiva.com/13084/mbrs2h100-d-76602-13084146.pdf?src-supplier=Mouser, ComponentLink2URL=https://datasheet.ciiva.com/13084/mbrs2h100-d-76602-13084146.pdf?src-supplier=Mouser, ComponentLink3Description=https://datasheet.ciiva.com/30479/0900766b812769c5-30479153.pdf?src-supplier=Rs, ComponentLink3URL=https://datasheet.ciiva.com/30479/0900766b812769c5-30479153.pdf?src-supplier=Rs, ComponentLink4Description=https://datasheet.ciiva.com/8292/mbrs2h100-d-8292460.pdf?src-supplier=Avnet, ComponentLink4URL=https://datasheet.ciiva.com/8292/mbrs2h100-d-8292460.pdf?src-supplier=Avnet, ComponentLink5Description=https://datasheet.ciiva.com/8294/mbrs2h100-d-8294965.pdf?src-supplier=Avnet, ComponentLink5URL=https://datasheet.ciiva.com/8294/mbrs2h100-d-8294965.pdf?src-supplier=Avnet, ComponentLink6Description=https://datasheet.ciiva.com/916/mbrs2h100-d-916034.pdf?src-supplier=Digikey, ComponentLink6URL=https://datasheet.ciiva.com/916/mbrs2h100-d-916034.pdf?src-supplier=Digikey, ComponentLink7Description=https://datasheet.ciiva.com/916/mbrs2h100-d-916035.pdf?src-supplier=Digikey, ComponentLink7URL=https://datasheet.ciiva.com/916/mbrs2h100-d-916035.pdf?src-supplier=Digikey, Halogen Free=5694HalogenFree, Item Type=Diode, Lead Free=5697LeadFree, Manufacturer Part Number=MBRS2H100T3G, Pricing="2500=0.155, 5000=0.151, 7500=0.15, 10000=0.148, 12500=0.144 (USD)", RoHS=Yes, Stock=27500, Supplier="Future Electronics"
D6: "DIODE GEN PURP 600V 1A SMA", Average Rectified Current=2A, Case/Package=SMA, Forward Voltage=1.25V, LCSC Part Number=C50432, Manufacturer="ON Semiconductor", Max Forward Surge Current (Ifsm)=30A, Max Operating Temperature=175°C, Max Repetitive Reverse Voltage (Vrrm)=600V, Max Reverse Current=5uA, Min Operating Temperature=-65°C, Output Current=1A, Package Quantity=1, ComponentLink1Description=https://datasheet.ciiva.com/8293/mura160t3-d-8293035.pdf?src-supplier=Avnet, ComponentLink1URL=https://datasheet.ciiva.com/8293/mura160t3-d-8293035.pdf?src-supplier=Avnet, ComponentLink2Description=https://datasheet.ciiva.com/27056/2015775-27056224.pdf?src-supplier=Jameco, ComponentLink2URL=https://datasheet.ciiva.com/27056/2015775-27056224.pdf?src-supplier=Jameco, ComponentLink3Description=https://datasheet.ciiva.com/16395/mura160t3-d-16395990.pdf?src-supplier=Future+Electronics, ComponentLink3URL=https://datasheet.ciiva.com/16395/mura160t3-d-16395990.pdf?src-supplier=Future+Electronics, Current Rating=2A, Forward Current=2A, Halogen Free="Halogen Free", Height=2mm, Item Type=Diode, Lead Free="Lead Free", Length=4.32mm, Manufacturer Part Number=MURA160T3G, Max Reverse Voltage (DC)=600V, Max Surge Current=30A, Packaging="Tape and Reel", Peak Non-Repetitive Surge Current=30A, Pins=2, Polarity=Standard, Pricing="5000=0.109, 10000=0.106, 15000=0.104, 20000=0.103, 25000=0.0996 (USD)", Radiation Hardening=No, Reach SVHC Compliant=No, Recovery Time=75ns, Reverse Recovery Time=75ns, Reverse Recovery Time-Max=75ns, Reverse Voltage=600V, RoHS=Yes, RoHS Compliant=Yes, Series=-, Stock=190000, Supplier="Future Electronics", Voltage Rating (DC)=600V, Width=2.6mm
D7: "Diode Zener Single 13V 5% 200mW 2-Pin SOD-323 T/R", LCSC Part Number=C669053, Manufacturer=MCC, Supplier Part Number=MMSZ5243BS-FDICT-ND, Category="Zener Diodes", ComponentLink1Description=https://datasheet.ciiva.com/26844/getdatasheetpartid-746365-26844934.pdf?src-supplier=Verical, ComponentLink1URL=https://datasheet.ciiva.com/26844/getdatasheetpartid-746365-26844934.pdf?src-supplier=Verical, ComponentLink2Description=https://datasheet.ciiva.com/913/smd15pl-smd1200plsod-123fl-913095.pdf?src-supplier=Digikey, ComponentLink2URL=https://datasheet.ciiva.com/913/smd15pl-smd1200plsod-123fl-913095.pdf?src-supplier=Digikey, ComponentLink3Description=https://datasheet.ciiva.com/913/smd15pl-smd1200plsod-123fl-913096.pdf?src-supplier=Digikey, ComponentLink3URL=https://datasheet.ciiva.com/913/smd15pl-smd1200plsod-123fl-913096.pdf?src-supplier=Digikey, ComponentLink4Description=https://datasheet.ciiva.com/913/smd15pl-smd1200plsod-123fl-913097.pdf?src-supplier=Digikey, ComponentLink4URL=https://datasheet.ciiva.com/913/smd15pl-smd1200plsod-123fl-913097.pdf?src-supplier=Digikey, ComponentLink5Description=https://datasheet.ciiva.com/8348/ds31038-8348008.pdf?src-supplier=Avnet, ComponentLink5URL=https://datasheet.ciiva.com/8348/ds31038-8348008.pdf?src-supplier=Avnet, ComponentLink6Description=https://datasheet.ciiva.com/891/ds31038-891527.pdf?src-supplier=Digikey, ComponentLink6URL=https://datasheet.ciiva.com/891/ds31038-891527.pdf?src-supplier=Digikey, ComponentLink7Description=https://datasheet.ciiva.com/891/ds31038-891528.pdf?src-supplier=Digikey, ComponentLink7URL=https://datasheet.ciiva.com/891/ds31038-891528.pdf?src-supplier=Digikey, ComponentLink8Description=https://datasheet.ciiva.com/891/ds31038-891529.pdf?src-supplier=Digikey, ComponentLink8URL=https://datasheet.ciiva.com/891/ds31038-891529.pdf?src-supplier=Digikey, Item Type=Diodes, Lead Free=5697LeadFree, Manufacturer Part Number=SMD110PL-TP, Pricing="1=0.15, 10=0.105, 100=0.0702, 500=0.05344, 1000=0.04776 (USD)", RoHS=Yes, Stock=3669579, Supplier=Digikey
D9: "DIODE ZENER 13V 200MW SOD323", LCSC Part Number=C5249130, Manufacturer="Diodes Zetex", ComponentLink1Description=https://datasheet.ciiva.com/8348/ds31038-8348008.pdf?src-supplier=Avnet, ComponentLink1URL=https://datasheet.ciiva.com/8348/ds31038-8348008.pdf?src-supplier=Avnet, ComponentLink2Description=https://datasheet.ciiva.com/891/ds31038-891527.pdf?src-supplier=Digikey, ComponentLink2URL=https://datasheet.ciiva.com/891/ds31038-891527.pdf?src-supplier=Digikey, ComponentLink3Description=https://datasheet.ciiva.com/891/ds31038-891528.pdf?src-supplier=Digikey, ComponentLink3URL=https://datasheet.ciiva.com/891/ds31038-891528.pdf?src-supplier=Digikey, ComponentLink4Description=https://datasheet.ciiva.com/891/ds31038-891529.pdf?src-supplier=Digikey, ComponentLink4URL=https://datasheet.ciiva.com/891/ds31038-891529.pdf?src-supplier=Digikey, Item Type=Diodes, Manufacturer Part Number=MMSZ5243BS-7-F, Pricing="1=0.15, 10=0.105, 100=0.0707, 500=0.05384, 1000=0.04814 (USD)", RoHS=Yes, Stock=7247, Supplier=Digikey
D11 D12 D14 D15 D18 D19 D20 D21: "DIODE ARR SCHOTT 30V 200MA SOT23", Average Rectified Current=200mA, Case/Package=SOT-23-3, Forward Voltage=800mV, LCSC Part Number=C19726, Manufacturer="ON Semiconductor", Max Forward Surge Current (Ifsm)=600mA, Max Operating Temperature=150°C, Max Repetitive Reverse Voltage (Vrrm)=30V, Max Reverse Current=2uA, Min Operating Temperature=-55°C, Package Quantity=1, Peak Non-Repetitive Surge Current=1A, Power Dissipation=225mW, ComponentLink1Description=https://datasheet.ciiva.com/1180/bat54slt1-d-1180304.pdf?src-supplier=Element14, ComponentLink1URL=https://datasheet.ciiva.com/1180/bat54slt1-d-1180304.pdf?src-supplier=Element14, ComponentLink2Description=https://datasheet.ciiva.com/1180/bat54slt1-d-1180305.pdf?src-supplier=Element14, ComponentLink2URL=https://datasheet.ciiva.com/1180/bat54slt1-d-1180305.pdf?src-supplier=Element14, ComponentLink3Description=https://datasheet.ciiva.com/14558/70099484-14558437.pdf?src-supplier=Allied+Electronics, ComponentLink3URL=https://datasheet.ciiva.com/14558/70099484-14558437.pdf?src-supplier=Allied+Electronics, Current Rating=200mA, Element Configuration=Dual, Forward Current=200mA, Halogen Free="Halogen Free", Height=0.94mm, Item Type=Diode, Lead Free="Lead Free", Length=2.9mm, Manufacturer Part Number=BAT54SLT1G, Max Reverse Leakage Current=2uA, Max Reverse Voltage (DC)=30V, Max Surge Current=600mA, Packaging="Tape and Reel", Pins=3, Pricing="3000=0.0141, 12000=0.0135, 30000=0.0131, 75000=0.0128, 120000=0.0122 (USD)", Radiation Hardening=No, Reach SVHC Compliant=No, Recovery Time=5ns, Reverse Recovery Time=5ns, Reverse Voltage=30V, RoHS=No, Series=-, Stock=10110000, Supplier="Future Electronics", Voltage Rating (DC)=30V, Width=1.3mm
D13 D16: "SMC(DO-214AB) Diodes - Fast Recovery Rectifiers ROHS", LCSC Part Number=C7436549, Manufacturer=FUXINSEMI, Package=SMC(DO-214AB), ComponentLink1Description=LCSC, ComponentLink1URL=https://www.lcsc.com/product-detail/Diodes-Fast-Recovery-Rectifiers_FUXINSEMI-MURS360T3G_C7436549.html, Item Type=Diodes, Manufacturer Part Number=MURS360T3G
D17: "DIODE ARRAY GP 200V 8A D2PAK", LCSC Part Number=C236158, Manufacturer="ON Semiconductor", ComponentLink1Description=https://datasheet.ciiva.com/906/murb1620ct-d-906005.pdf?src-supplier=Digikey, ComponentLink1URL=https://datasheet.ciiva.com/906/murb1620ct-d-906005.pdf?src-supplier=Digikey, ComponentLink2Description=https://datasheet.ciiva.com/16293/murb1620ct-d-16293538.pdf?src-supplier=Future+Electronics, ComponentLink2URL=https://datasheet.ciiva.com/16293/murb1620ct-d-16293538.pdf?src-supplier=Future+Electronics, ComponentLink3Description=https://datasheet.ciiva.com/8292/murb1620ct-d-8292357.pdf?src-supplier=Avnet, ComponentLink3URL=https://datasheet.ciiva.com/8292/murb1620ct-d-8292357.pdf?src-supplier=Avnet, ComponentLink4Description=https://datasheet.ciiva.com/906/murb1620ct-d-906006.pdf?src-supplier=Digikey, ComponentLink4URL=https://datasheet.ciiva.com/906/murb1620ct-d-906006.pdf?src-supplier=Digikey, ComponentLink5Description=https://datasheet.ciiva.com/906/murb1620ct-d-906007.pdf?src-supplier=Digikey, ComponentLink5URL=https://datasheet.ciiva.com/906/murb1620ct-d-906007.pdf?src-supplier=Digikey, Item Type=Diode, Manufacturer Part Number=MURB1620CTT4G, Pricing="800=0.64, 1600=0.625, 2400=0.615, 3200=0.61, 4000=0.59 (USD)", RoHS=Yes, Stock=72800, Supplier="Future Electronics"
D22 D24: "DIODE SCHOTTKY 30V 200MA SOD323", LCSC Part Number=C134397, Manufacturer=Diodes, ComponentLink1Description=https://datasheet.ciiva.com/4715/ds30100-83070-4715539.pdf?src-supplier=Mouser, ComponentLink1URL=https://datasheet.ciiva.com/4715/ds30100-83070-4715539.pdf?src-supplier=Mouser, ComponentLink2Description=https://datasheet.ciiva.com/8301/ds30100-8301357.pdf?src-supplier=Avnet, ComponentLink2URL=https://datasheet.ciiva.com/8301/ds30100-8301357.pdf?src-supplier=Avnet, ComponentLink3Description=https://datasheet.ciiva.com/1180/ds30100-1180188.pdf?src-supplier=Element14, ComponentLink3URL=https://datasheet.ciiva.com/1180/ds30100-1180188.pdf?src-supplier=Element14, ComponentLink4Description=https://datasheet.ciiva.com/912/ds30100-912909.pdf?src-supplier=Digikey, ComponentLink4URL=https://datasheet.ciiva.com/912/ds30100-912909.pdf?src-supplier=Digikey, ComponentLink5Description=https://datasheet.ciiva.com/912/ds30100-912910.pdf?src-supplier=Digikey, ComponentLink5URL=https://datasheet.ciiva.com/912/ds30100-912910.pdf?src-supplier=Digikey, ComponentLink6Description=https://datasheet.ciiva.com/912/ds30100-912911.pdf?src-supplier=Digikey, ComponentLink6URL=https://datasheet.ciiva.com/912/ds30100-912911.pdf?src-supplier=Digikey, Item Type=Diode, Manufacturer Part Number=BAT42WS-7-F, Pricing="3000=0.0556, 9000=0.0535, 15000=0.0526, 30000=0.0499, 45000=0.0506, 60000=0.048, 75000=0.0489 (USD)", RoHS=Yes, Stock=6000, Supplier="Future Electronics"
D25: "DIODE SCHOTTKY 40V 1A SOD123", Average Rectified Current=1A, Capacitance=110pF, Case/Package=SOD-123-2, Forward Voltage=450mV, LCSC Part Number=C82544, Manufacturer=Diodes, Max Forward Surge Current (Ifsm)=25A, Max Operating Temperature=125°C, Max Power Dissipation=450mW, Max Repetitive Reverse Voltage (Vrrm)=40V, Max Reverse Current=50uA, Min Operating Temperature=-65°C, Package Quantity=3000, Supplier Part Number 1=1N5819HW-FDICT-ND, Category="Schottky Diodes", ComponentLink1Description=https://datasheet.ciiva.com/16303/ds30217-16303296.pdf?src-supplier=Future+Electronics, ComponentLink1URL=https://datasheet.ciiva.com/16303/ds30217-16303296.pdf?src-supplier=Future+Electronics, ComponentLink2Description=https://datasheet.ciiva.com/27092/1538419-27092484.pdf?src-supplier=Jameco, ComponentLink2URL=https://datasheet.ciiva.com/27092/1538419-27092484.pdf?src-supplier=Jameco, ComponentLink3Description=https://datasheet.ciiva.com/912/ds30217-912801.pdf?src-supplier=Digi-Key, ComponentLink3URL=https://datasheet.ciiva.com/912/ds30217-912801.pdf?src-supplier=Digi-Key, ComponentLink4Description=https://datasheet.ciiva.com/1177/ds30217-1177089.pdf?src-supplier=Element14, ComponentLink4URL=https://datasheet.ciiva.com/1177/ds30217-1177089.pdf?src-supplier=Element14, ComponentLink5Description=https://datasheet.ciiva.com/912/ds30217-912802.pdf?src-supplier=Digi-Key, ComponentLink5URL=https://datasheet.ciiva.com/912/ds30217-912802.pdf?src-supplier=Digi-Key, ComponentLink6Description=https://datasheet.ciiva.com/912/ds30217-912803.pdf?src-supplier=Digi-Key, ComponentLink6URL=https://datasheet.ciiva.com/912/ds30217-912803.pdf?src-supplier=Digi-Key, ComponentLink7Description=https://datasheet.ciiva.com/8303/ds30217-8303132.pdf?src-supplier=Avnet, ComponentLink7URL=https://datasheet.ciiva.com/8303/ds30217-8303132.pdf?src-supplier=Avnet, ComponentLink8Description=https://datasheet.ciiva.com/25919/ds30217-25919644.pdf?src-supplier=Avnet+Europe, ComponentLink8URL=https://datasheet.ciiva.com/25919/ds30217-25919644.pdf?src-supplier=Avnet+Europe, Contact Plating=Tin,Matte, Current Rating=1A, Element Configuration=Single, Forward Current=1A, Height=1.25mm, Item Type=Diode, Lead Free="Lead Free", Length=2.85mm, Manufacturer Part Number=1N5819HW-7-F, Max Reverse Voltage (DC)=40V, Number of Pins=2, Output Current=1A, Packaging="Tape and Reel", Peak Non-Repetitive Surge Current=25A, Polarity=Standard, Pricing 1="1=0.46000, 10=0.34500, 100=0.19530, 500=0.12936, 1000=0.09918 (USD)", Radiation Hardening=No, REACH SVHC="No SVHC", RoHS=Yes, RoHS Compliant=Yes, Series=-, Supplier 1=Digi-Key, Termination=SMD/SMT, Voltage Rating (DC)=40V, Weight=0.000353oz, Width=1.7mm